# Altium PCB EEM_FMC_Carrier.PcbDoc (part 12 of 19)
Units mm, origin at the board's own origin, x right, y up, seen from the top; angles counter-clockwise.
Board outline 222.9 x 100 mm, 6 copper layers (TopLayer, MidLayer1, MidLayer2, SignalLayer1, Internal Plane 1, BottomLayer), stack 1.528 mm thick; 790 components, 743 nets, 3570 pads, 2277 vias.
Unrouted connection lines stored in the file: 3.
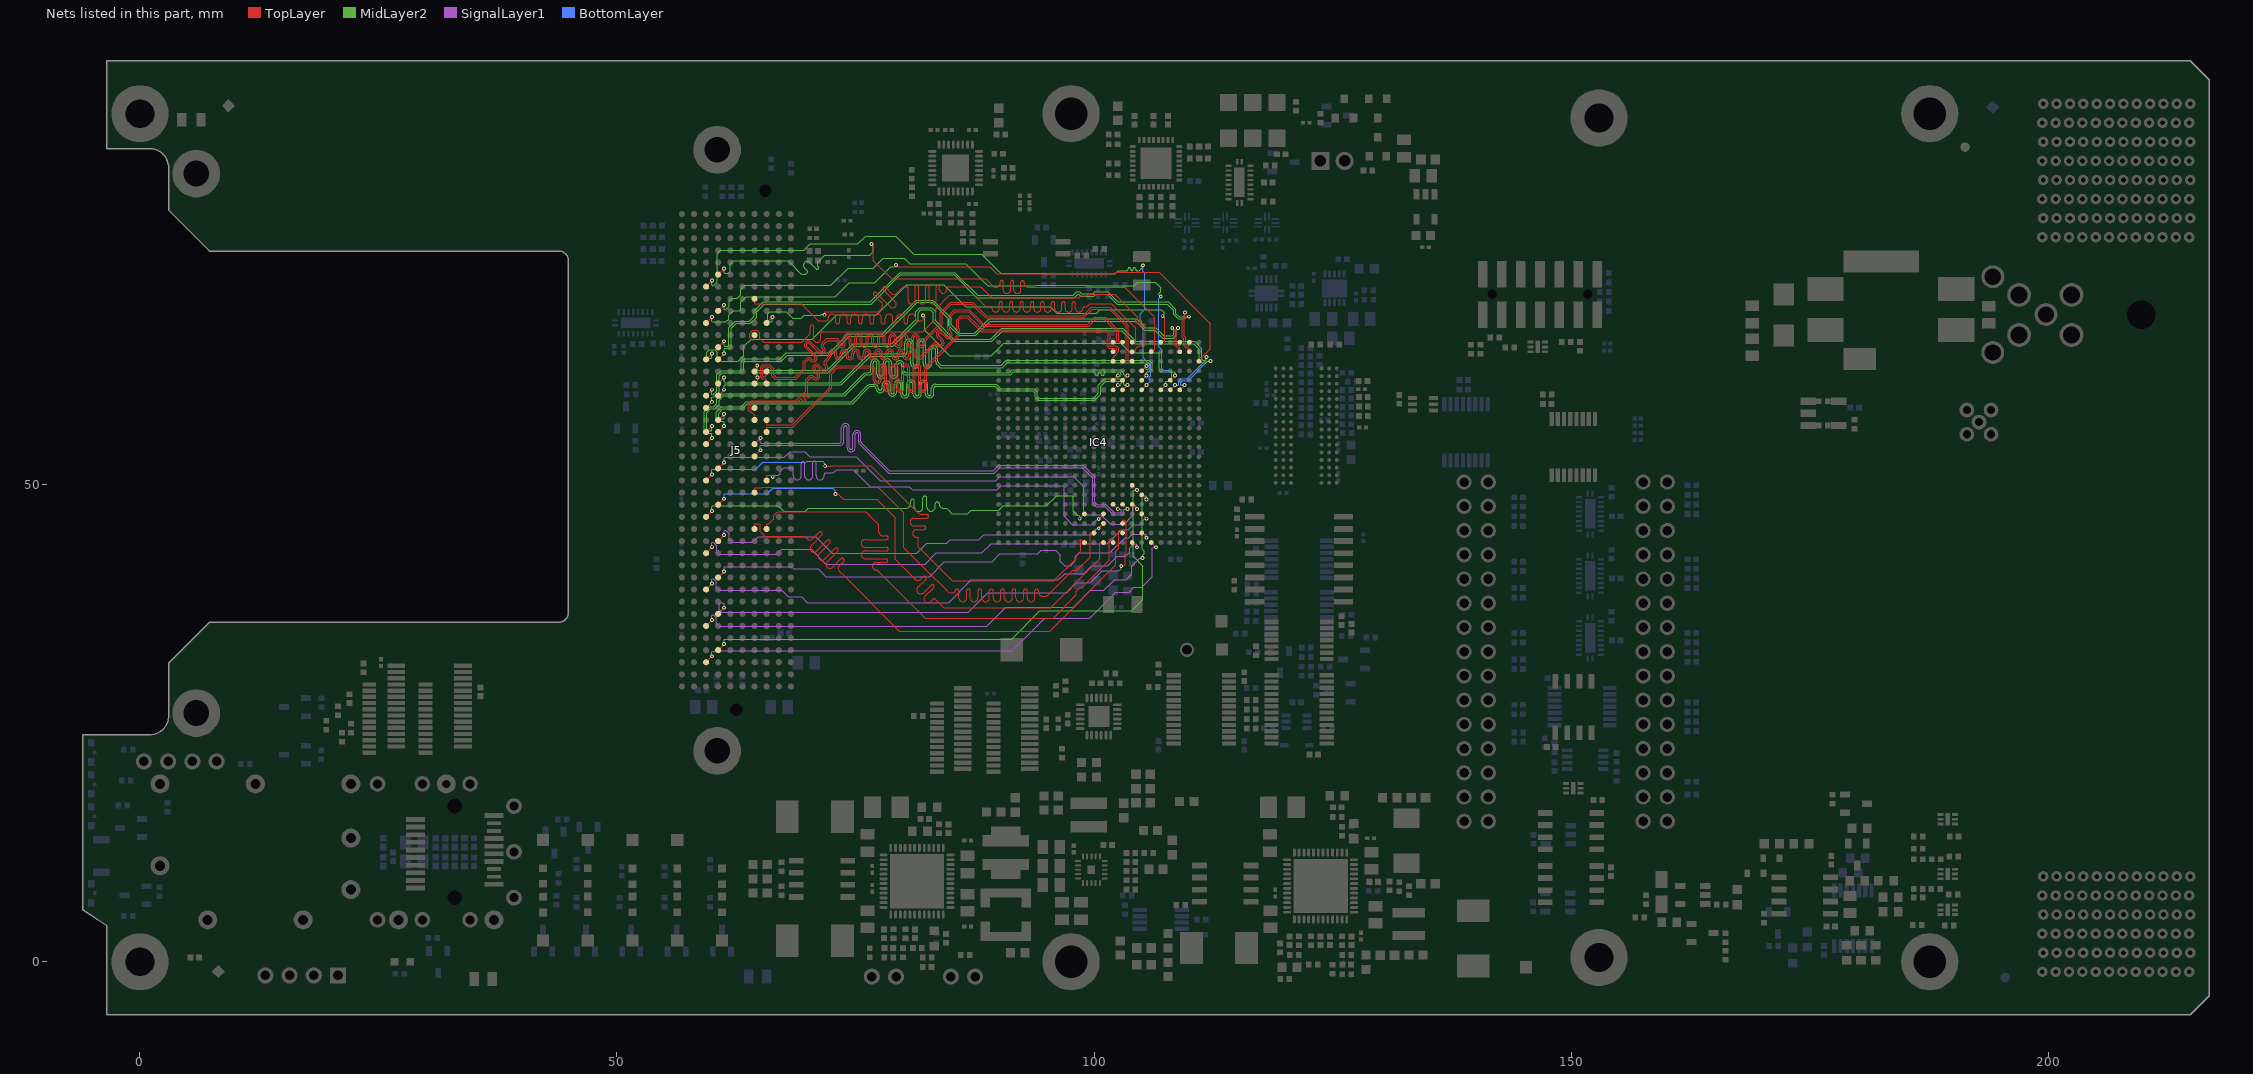
[diagram p14: the nets of this part, all layers, seen from the top]

## Via types
v1: diameter 0.4, hole 0.2, TopLayer to BottomLayer, tented both sides, 1032 vias
v2: diameter 0.5, hole 0.2, TopLayer to BottomLayer, tented both sides, 979 vias
v3: diameter 0.5, hole 0.2, TopLayer to BottomLayer, 162 vias
v4: diameter 0.8, hole 0.5, TopLayer to BottomLayer, tented both sides, 102 vias
v5: diameter 0.6, hole 0.3, TopLayer to BottomLayer, tented both sides, 2 vias

## Nets (pads, with @x,y where several pads share a name; then routed paths per layer and width w, separated by ;. In a path a pad name is that pad's centre, name@x,y a point inside that pad or via, vN(x,y) a via of type N, cw(c..) or ccw(c..) an arc to the next point about the centre after c; other vN are vias at no path point) (continued)
FMC.LA_N8: IC4.A21 J5.g13 | length 61.6
  TopLayer w0.085: J5.g13@60.608,63.149 61.218,63.759 v1(61.218,63.78) ; v1(109.948,67.625) 109.65,67.625 109.437,67.412 109.437,65.568 109.599,65.406 109.599,64.648 109.692,64.556 109.95,64.556 110,64.606 110,64.948 IC4.A21@109.998,64.95
  MidLayer2 w0.11: v1(61.218,63.78) 61.218,64.232 61.282,64.297 61.761,64.297 61.964,64.5 61.964,66.389 62.5,66.925 63.973,66.925 64.637,67.589 64.637,68.15 65.412,68.925 76.635,68.925 79.71,72 85.325,72 87.712,69.613 97.913,69.613 98.275,69.975 98.397,69.975 98.59,69.782 99.999,69.782 100.192,69.975 101.365,69.975 102.415,68.925 107.663,68.925 108.35,68.238 108.35,67.852 108.814,67.388 109.454,67.388 109.672,67.605 109.928,67.605 v1(109.948,67.625)
FMC.LA_N9: IC4.F20 J5.d15 | length 61.9
  TopLayer w0.085: J5.d15@64.418,60.609 64.748,60.939 64.748,61.239 v1(64.737,61.25) ; IC4.F20@108.998,59.95 v1(109.498,60.45)
  MidLayer2 w0.11: v1(64.737,61.25) 64.723,61.264 64.723,61.692 64.787,61.757 72.117,61.757 74.885,64.525 78.91,64.525 81.562,67.177 81.562,68.05 81.837,68.325 82.85,68.325 83.15,68.025 83.15,67.075 85.187,65.038 89.298,65.038 90.41,66.15 102.9,66.15 104.262,64.788 110.437,64.788 111.038,64.187 111.038,63.072 111.306,62.804 111.778,62.804 111.938,62.964 112.195,62.964 v1(112.214,62.984)
  BottomLayer w0.085: v1(109.498,60.45) 109.154,60.45 109.104,60.5 109.104,60.775 109.229,60.9 109.854,60.9 110.198,61.244 111.887,62.933 112.164,62.933 v1(112.214,62.984)
FMC.LA_N10: IC4.C15 J5.c15 | length 70.1
  TopLayer w0.085: J5.c15@65.688,60.609 65.656,60.641 65.656,61.006 65.525,61.138 65.23,61.138 65.056,61.312 65.056,61.35 65.056,62.356 65.287,62.587 66.013,62.587 66.45,62.15 66.45,61.731 66.45,61.525 66.675,61.3 68.65,61.3 69.538,62.188 69.538,62.682 69.538,62.888 69.831,63.181 cw(c70.117,62.895) 70.369,63.212 70.372,63.212 70.403,63.182 ; 69.733,64.397 70.708,63.421 cw(c70.573,63.284) 70.709,63.148 cw(c70.573,63.284) 70.437,63.148 70.403,63.181 ; 69.733,64.397 cw(c70.018,64.683) 69.732,64.969 69.733,64.971 cw(c70.018,64.683) 70.269,65 70.273,65 71.281,63.992 ccw(c71.417,64.129) 71.553,63.992 ccw(c71.417,64.129) 71.553,64.265 71.52,64.298 cw(c71.806,64.584) 71.52,64.87 71.625,64.975 71.78,65.13 71.987,65.337 72.935,65.337 cw(c72.935,64.933) 73.339,64.933 73.339,64.822 ccw(c73.532,64.822) 73.532,64.63 ccw(c73.532,64.822) 73.724,64.822 73.724,65.411 cw(c74.129,65.411) 74.129,65.816 cw(c74.129,65.411) 74.533,65.411 74.533,64.822 ccw(c74.726,64.822) 74.726,64.63 ccw(c74.726,64.822) 74.918,64.822 74.918,65.411 cw(c75.323,65.411) 75.323,65.816 cw(c75.323,65.411) 75.727,65.411 75.727,64.822 ccw(c75.92,64.822) 75.92,64.63 ccw(c75.92,64.822) 76.112,64.822 76.112,65.411 cw(c76.517,65.411) 76.517,65.816 cw(c76.517,65.411) 76.921,65.411 76.921,64.822 ccw(c77.114,64.822) 77.114,64.63 ccw(c77.114,64.822) 77.306,64.822 77.306,65.411 cw(c77.711,65.411) 77.711,65.816 cw(c77.711,65.411) 78.115,65.411 78.115,64.822 ccw(c78.308,64.822) 78.308,64.63 ccw(c78.308,64.822) 78.5,64.822 78.5,65.411 cw(c78.905,65.411) 78.905,65.816 cw(c78.905,65.411) 79.309,65.411 79.309,64.822 ccw(c79.502,64.822) 79.502,64.63 ccw(c79.502,64.822) 79.694,64.822 79.694,65.411 cw(c80.099,65.411) 80.099,65.816 cw(c80.099,65.411) 80.503,65.411 80.503,64.822 ccw(c80.696,64.822) 80.696,64.63 ccw(c80.696,64.822) 80.888,64.822 80.888,65.411 cw(c81.293,65.411) 81.293,65.816 cw(c81.293,65.411) 81.697,65.411 81.697,64.822 ccw(c81.89,64.822) 81.89,64.63 ccw(c81.89,64.822) 82.082,64.822 82.082,64.877 cw(c82.698,64.877) 82.261,65.311 cw(c82.699,64.878) 82.263,65.313 ; 82.264,65.314 82.486,65.536 83.875,66.925 83.875,68.05 84.962,69.137 87.288,69.137 88.725,67.7 98.8,67.7 99.737,68.637 101.688,68.637 103.604,66.721 103.604,63 103.654,62.95 IC4.C15@103.998,62.95
FMC.LA_N11: IC4.A20 J5.h17 | length 62.3
  TopLayer w0.085: J5.h17@59.338,58.069 59.948,58.679 v1(59.948,58.7) ; v1(108.798,66.45) 108.798,66.445 108.604,66.251 108.604,64.81 108.858,64.556 108.948,64.556 108.998,64.606 IC4.A20@108.998,64.95
  MidLayer2 w0.11: v1(59.948,58.7) 59.948,59.152 60.012,59.217 60.202,59.217 60.712,59.727 60.712,61.412 61.025,61.725 62.95,61.725 63.262,62.037 63.262,62.775 63.437,62.95 67.21,62.95 67.86,63.6 72.385,63.6 74.36,65.575 77.923,65.575 81.461,69.113 83.025,69.113 84.775,67.363 84.775,66.69 85.802,65.663 87.623,65.663 89.11,67.15 104.365,67.15 105.065,66.45 105.29,66.225 106.365,66.225 107.227,65.363 108.323,65.363 108.617,65.656 108.617,66.241 108.798,66.422 v1(108.798,66.45)
FMC.LA_N12: IC4.D16 J5.g16 | length 61.8
  TopLayer w0.085: J5.g16@60.608,59.339 61.218,59.949 v1(61.218,59.97) ; IC4.D16@104.998,61.95 v1(105.498,62.45)
  MidLayer2 w0.11: v1(61.218,59.97) 61.218,60.422 61.282,60.487 73.522,60.487 76.535,63.5 78.489,63.5 79.957,63.5 ccw(c79.957,63.942) 80.399,63.942 80.399,64.841 cw(c80.604,64.841) 80.604,65.046 cw(c80.604,64.841) 80.809,64.841 80.809,62.665 ccw(c81.251,62.665) 81.251,62.223 ccw(c81.251,62.665) 81.693,62.665 81.693,64.841 cw(c81.898,64.841) 81.898,65.046 cw(c81.898,64.841) 82.103,64.841 82.103,62.665 ccw(c82.545,62.665) 82.545,62.223 ccw(c82.545,62.665) 82.987,62.665 82.987,64.136 cw(c83.192,64.136) 83.192,64.341 cw(c83.192,64.136) 83.397,64.136 83.397,62.936 ccw(c83.839,62.936) 83.526,62.624 83.862,62.288 84.475,62.288 90.373,62.288 90.885,62.8 105.664,62.8 105.863,62.601 105.863,62.278 105.654,62.069 105.562,62.069 105.498,62.133 v1(105.498,62.45)
FMC.LA_N13: IC4.A14 J5.d18 | length 64.7
  TopLayer w0.085: J5.d18@64.418,56.799 64.418,57.278 64.035,57.661 63.933,57.661 63.759,57.835 63.759,58.422 64.137,58.8 68.738,58.8 69.763,59.825 69.763,60.852 69.763,61.013 70.086,61.336 cw(c70.372,61.05) 70.623,61.367 70.627,61.367 70.657,61.337 ; 70.611,61.927 cw(c70.897,62.214) 70.61,62.5 70.612,62.501 cw(c70.897,62.214) 71.148,62.531 71.151,62.531 71.562,62.12 ccw(c71.698,62.257) 71.834,62.121 ccw(c71.698,62.257) 71.834,62.393 71.775,62.452 cw(c72.061,62.738) 71.775,63.024 71.88,63.129 72.025,63.275 72.099,63.349 ; 70.611,61.927 70.989,61.549 cw(c70.854,61.412) 70.99,61.276 cw(c70.854,61.412) 70.718,61.276 70.658,61.336 ; 72.1,63.349 ccw(c71.813,63.634) 72.217,63.634 72.217,63.805 cw(c72.621,63.805) 72.621,64.21 cw(c72.621,63.805) 73.026,63.805 73.026,63.523 ccw(c73.218,63.523) 73.218,63.33 ccw(c73.218,63.523) 73.411,63.523 73.411,63.805 cw(c73.815,63.805) 73.815,64.21 cw(c73.815,63.805) 74.22,63.805 74.22,63.523 ccw(c74.412,63.523) 74.412,63.33 ccw(c74.412,63.523) 74.605,63.523 74.605,63.805 cw(c75.009,63.805) 75.009,64.21 cw(c75.009,63.805) 75.414,63.805 75.414,63.523 ccw(c75.606,63.523) 75.606,63.33 ccw(c75.606,63.523) 75.799,63.523 75.799,63.805 cw(c76.203,63.805) 76.203,64.21 cw(c76.203,63.805) 76.608,63.805 76.608,63.523 ccw(c76.8,63.523) 76.8,63.33 ccw(c76.8,63.523) 76.993,63.523 76.993,63.805 cw(c77.397,63.805) 77.397,64.21 cw(c77.397,63.805) 77.802,63.805 77.802,63.523 ccw(c77.994,63.523) 77.994,63.33 ccw(c77.994,63.523) 78.187,63.523 78.187,63.805 cw(c78.591,63.805) 78.591,64.21 cw(c78.591,63.805) 78.996,63.805 78.996,63.523 ccw(c79.188,63.523) 79.188,63.33 ccw(c79.188,63.523) 79.381,63.523 79.381,63.805 cw(c79.785,63.805) 79.785,64.21 cw(c79.785,63.805) 80.19,63.805 80.19,63.523 ccw(c80.382,63.523) 80.382,63.33 ccw(c80.382,63.523) 80.575,63.523 80.575,63.805 cw(c80.979,63.805) 80.979,64.21 cw(c80.979,63.805) 81.384,63.805 81.384,63.579 ccw(c81.576,63.579) 81.576,63.387 81.737,63.387 82.151,63.801 82.159,63.809 83.137,64.787 cw(c83.423,64.501) 83.674,64.818 83.678,64.818 83.708,64.788 ; 83.574,65.466 cw(c83.859,65.753) 83.573,66.039 83.575,66.04 cw(c83.859,65.753) 84.111,66.07 84.114,66.07 84.588,65.597 ccw(c84.724,65.733) 84.86,65.597 ccw(c84.724,65.733) 84.86,65.869 84.843,65.886 cw(c85.279,66.321) 84.663,66.322 84.663,66.637 84.663,67.638 85.362,68.337 86.938,68.337 88.463,66.812 99.337,66.812 100.087,67.562 101.167,67.562 102.129,66.6 102.604,66.125 102.604,65 102.654,64.95 IC4.A14@102.998,64.95 ; 83.574,65.466 84.015,65.025 cw(c83.88,64.888) 84.016,64.752 cw(c83.88,64.888) 83.744,64.752 83.709,64.787
FMC.LA_N14: IC4.B13 J5.c19 | length 69.4
  TopLayer w0.085: J5.c19@65.688,55.529 65.688,56.008 65.738,56.058 68.441,56.058 72.487,60.104 72.487,61.637 73.1,62.25 76.179,62.25 76.681,62.25 cw(c76.681,62.058) 76.873,62.058 76.873,60.99 ccw(c77.278,60.99) 77.278,60.585 ccw(c77.278,60.99) 77.682,60.99 77.682,62.249 cw(c77.875,62.249) 77.875,62.441 cw(c77.875,62.249) 78.067,62.249 78.067,60.115 ccw(c78.472,60.115) 78.472,59.71 ccw(c78.472,60.115) 78.876,60.115 78.876,62.249 cw(c79.069,62.249) 79.069,62.441 cw(c79.069,62.249) 79.261,62.249 79.261,60.115 ccw(c79.666,60.115) 79.666,59.71 ccw(c79.666,60.115) 80.07,60.115 80.07,62.249 cw(c80.263,62.249) 80.263,62.441 cw(c80.263,62.249) 80.455,62.249 80.455,60.115 ccw(c80.86,60.115) 80.86,59.71 ccw(c80.86,60.115) 81.264,60.115 81.264,62.249 cw(c81.457,62.249) 81.457,62.441 cw(c81.457,62.249) 81.649,62.249 81.649,60.115 ccw(c82.054,60.115) 82.054,59.71 ccw(c82.054,60.115) 82.458,60.115 82.458,62.016 cw(c82.862,62.016) 82.575,62.3 ; 82.576,62.301 82.65,62.375 85.937,65.662 85.937,66.286 85.823,66.4 85.823,67.223 86.1,67.5 86.725,67.5 87,67.225 88.187,66.038 101.262,66.038 101.515,65.785 101.515,65.348 101.396,65.229 101.396,64.512 101.57,64.338 102.262,64.338 102.397,64.203 102.397,64.132 102.294,64.029 102.077,64.029 IC4.B13@101.998,63.95
FMC.LA_N15: IC4.E14 J5.h20 | length 59.7
  TopLayer w0.085: J5.h20@59.338,54.259 59.948,54.869 v1(59.948,54.89) ; IC4.E14@102.998,60.95 v1(103.498,61.45)
  MidLayer2 w0.11: v1(59.948,54.89) 59.948,55.342 59.884,55.407 59.528,55.407 59.163,55.772 59.163,57.661 59.702,58.2 60.14,58.2 60.463,58.523 60.463,58.986 61.027,59.55 73.765,59.55 75.984,61.769 76.225,61.769 76.399,61.769 ccw(c76.399,61.974) 76.604,61.974 76.604,62.758 cw(c77.046,62.758) 77.046,63.2 cw(c77.046,62.758) 77.488,62.758 77.488,61.598 ccw(c77.693,61.598) 77.693,61.393 ccw(c77.693,61.598) 77.898,61.598 77.898,62.758 cw(c78.34,62.758) 78.34,63.2 cw(c78.34,62.758) 78.781,62.758 78.781,61.631 ccw(c78.986,61.631) 78.986,61.426 ccw(c78.986,61.631) 79.191,61.631 79.191,62.565 cw(c79.633,62.565) 79.633,63.007 cw(c79.633,62.565) 80.075,62.565 80.075,61.974 ccw(c80.28,61.974) 80.28,61.769 81.3,61.769 91.159,61.769 91.452,62.062 102.758,62.062 103.117,61.704 103.117,61.514 103.181,61.45 v1(103.498,61.45)
FMC.LA_N16: IC4.F14 J5.g19 | length 61.7
  TopLayer w0.085: J5.g19@60.608,55.529 61.218,56.139 v1(61.218,56.16) ; IC4.F14@102.998,59.95 v1(103.498,60.45)
  MidLayer2 w0.11: v1(61.218,56.16) 61.218,56.612 61.154,56.677 60.8,56.677 60.616,56.677 60.413,56.88 60.413,57.598 61.002,58.187 63.027,58.187 63.565,58.725 74.59,58.725 76.358,60.493 76.418,60.554 76.933,60.554 cw(c76.933,60.112) 77.375,60.112 ccw(c77.58,60.112) 77.58,59.907 ccw(c77.58,60.112) 77.785,60.112 77.785,60.435 cw(c78.227,60.435) 78.227,60.877 cw(c78.227,60.435) 78.669,60.435 78.669,59.732 ccw(c78.874,59.732) 78.874,59.527 ccw(c78.874,59.732) 79.079,59.732 79.079,60.539 cw(c79.521,60.539) 79.521,60.981 cw(c79.521,60.539) 79.963,60.539 79.963,59.546 ccw(c80.168,59.546) 80.168,59.341 ccw(c80.168,59.546) 80.373,59.546 80.373,60.539 cw(c80.815,60.539) 80.815,60.981 cw(c80.815,60.539) 81.257,60.539 81.257,59.546 ccw(c81.462,59.546) 81.462,59.341 ccw(c81.462,59.546) 81.667,59.546 81.667,60.539 cw(c82.109,60.539) 82.109,60.981 cw(c82.109,60.539) 82.551,60.539 82.551,59.546 ccw(c82.756,59.546) 82.756,59.341 ccw(c82.756,59.546) 82.961,59.546 82.961,60.112 cw(c83.403,60.112) 83.403,60.554 83.577,60.554 89.746,60.554 90.213,60.087 93.664,60.087 94.066,59.685 94.066,59.284 94.263,59.087 99.977,59.087 100.463,59.573 100.463,60.423 101.152,61.112 102.913,61.112 103.117,60.909 103.117,60.514 103.181,60.45 v1(103.498,60.45)
FMC.LA_N17: IC4.V14 J5.d21 | length 53.1
  TopLayer w0.085: J5.d21@64.418,52.989 65.028,53.599 v1(65.028,53.62) ; IC4.V14@102.998,47.95 v1(103.498,47.45)
  SignalLayer1 w0.11: v1(65.028,53.62) 65.028,54.072 65.092,54.137 73.175,54.137 73.349,54.137 ccw(c73.349,54.554) 73.766,54.554 73.766,55.997 cw(c73.946,55.997) 74.126,55.997 74.126,53.88 ccw(c74.543,53.88) 74.96,53.88 74.96,55.274 cw(c75.14,55.274) 75.32,55.274 75.32,54.543 ccw(c75.736,54.543) 75.442,54.248 76.242,53.448 78.459,51.231 89.556,51.231 90.125,51.8 98.775,51.8 99.863,50.712 99.863,48.052 100.24,47.675 101.19,47.675 102.015,46.85 102.88,46.85 102.913,46.85 103.117,47.053 103.117,47.386 103.181,47.45 v1(103.498,47.45)
FMC.LA_N18: IC4.W12 J5.c23 | length 49.7
  TopLayer w0.085: J5.c23@65.688,50.449 65.688,50.928 65.738,50.978 65.997,50.978 66.011,50.992 66.122,50.992 66.315,50.8 v1(66.323,50.8) ; v1(100.498,46.401) 100.998,46.901 IC4.W12@100.998,46.95
  SignalLayer1 w0.11: v1(66.323,50.8) 66.353,50.8 66.532,50.98 66.922,50.98 67.125,51.183 67.125,51.4 67.399,51.674 67.525,51.8 68.304,51.8 cw(c68.304,51.62) 68.484,51.62 68.484,50.934 ccw(c68.901,50.934) 69.318,50.934 69.318,52.222 cw(c69.498,52.222) 69.678,52.222 69.678,50.934 ccw(c70.095,50.934) 70.512,50.934 70.512,52.298 cw(c70.692,52.298) 70.872,52.298 70.872,50.934 ccw(c71.289,50.934) 71.706,50.934 71.706,51.058 cw(c71.886,51.058) 71.886,51.238 72.06,51.238 72.663,51.238 73.013,51.588 74.752,51.588 76.54,49.8 80.64,49.8 80.934,49.506 89.881,49.506 90.257,49.882 96.718,49.882 96.863,49.737 96.863,46.702 97.74,45.825 99.764,45.825 99.967,46.028 99.967,46.073 100.068,46.174 100.14,46.174 100.312,46.346 100.443,46.346 v1(100.498,46.401)
FMC.LA_N19: IC4.AB10 J5.h23 | length 56.4
  TopLayer w0.085: J5.h23@59.338,50.449 59.948,51.059 v1(59.948,51.08) ; v1(71.823,51.956) 71.824,51.957 72.33,51.957 72.395,52.022 76.603,52.022 76.875,51.75 81.329,47.296 81.551,47.074 ccw(c81.987,47.509) 81.555,47.07 ccw(c81.987,47.508) 81.987,46.893 82.464,46.893 cw(c82.464,46.7) 82.656,46.7 cw(c82.464,46.7) 82.464,46.508 81.144,46.508 ccw(c81.144,46.103) 80.74,46.103 ccw(c81.144,46.103) 81.144,45.699 82.183,45.699 cw(c82.183,45.506) 82.376,45.506 cw(c82.183,45.506) 82.183,45.314 81.407,45.314 ccw(c81.407,44.909) 81.003,44.909 ccw(c81.407,44.909) 81.407,44.505 ; 81.408,44.505 cw(c81.408,44.312) 81.6,44.312 81.6,43.475 81.675,43.4 85.025,40.05 85.137,39.938 95.788,39.938 98.125,42.275 98.125,42.575 98.591,43.041 98.591,44.187 98.641,44.236 98.712,44.236 IC4.AB10@98.998,43.95
  BottomLayer w0.085: v1(59.948,51.08) 59.948,51.559 59.998,51.609 60.825,51.609 60.829,51.613 64.563,51.613 65.3,52.35 69.8,52.35 69.925,52.475 71.543,52.475 71.796,52.222 71.796,51.983 v1(71.823,51.956)
FMC.LA_N20: IC4.V15 J5.g22 | length 52.3
  TopLayer w0.085: J5.g22@60.608,51.719 61.218,52.329 v1(61.218,52.35) ; IC4.V15@103.998,47.95 v1(104.498,47.45)
  SignalLayer1 w0.11: v1(61.218,52.35) 61.218,52.802 61.282,52.867 61.893,52.867 61.896,52.863 67.538,52.863 68.15,53.475 69.675,53.475 70.225,52.925 75.1,52.925 77.575,50.45 88.498,50.45 89.725,50.45 90.1,50.825 97.9,50.825 98.913,49.812 98.913,47.127 99.158,46.882 100.733,46.882 101.733,45.882 103.157,45.882 104.066,46.791 104.066,47.767 104.13,47.831 104.275,47.831 104.443,47.664 104.443,47.505 v1(104.498,47.45)
FMC.LA_N21: IC4.W10 J5.h26 | length 49.4
  TopLayer w0.085: J5.h26@59.338,46.639 59.948,47.249 v1(59.948,47.27) ; v1(98.498,46.45) IC4.W10@98.998,46.95
  MidLayer2 w0.11: v1(59.948,47.27) 59.948,47.722 60.012,47.787 66.928,47.787 67.477,47.238 69.723,47.238 70.041,47.556 80.154,47.556 80.327,47.556 ccw(c80.327,47.998) 80.769,47.998 80.769,48.28 cw(c80.974,48.28) 80.974,48.485 cw(c80.974,48.28) 81.179,48.28 81.179,47.647 ccw(c81.621,47.647) 81.621,47.205 ccw(c81.621,47.647) 82.063,47.647 82.063,48.603 cw(c82.268,48.603) 82.268,48.808 cw(c82.268,48.603) 82.473,48.603 82.473,47.674 ccw(c82.915,47.674) 82.915,47.232 ccw(c82.915,47.674) 83.357,47.674 83.357,47.998 cw(c83.562,47.998) 83.562,48.203 cw(c83.562,47.998) 83.767,47.998 ccw(c84.209,47.998) 84.209,47.556 84.534,47.556 84.774,47.316 85.109,46.981 86.781,46.981 87.125,47.325 90,47.325 90.463,47.788 95.013,47.788 96.1,48.875 97.65,48.875 97.835,48.69 97.835,47.232 98.236,46.831 98.425,46.831 98.498,46.758 v1(98.498,46.45)
FMC.LA_N22: IC4.AB12 J5.g25 | length 59.1
  TopLayer w0.085: J5.g25@60.608,47.909 61.218,48.519 v1(61.218,48.54) ; v1(72.89,49.032) 72.898,49.024 73.168,49.024 73.717,48.475 77.25,48.475 79.163,46.562 79.163,42.187 81.15,40.2 81.212,40.138 81.224,40.126 81.255,40.095 ccw(c81.541,40.381) 81.827,40.095 82.071,40.339 cw(c82.207,40.203) 82.343,40.339 cw(c82.207,40.203) 82.343,40.067 ; 82.343,40.066 81.537,39.26 ccw(c81.823,38.974) 82.074,38.657 82.078,38.657 82.915,39.495 cw(c83.051,39.359) 83.188,39.495 cw(c83.051,39.359) 83.188,39.222 82.274,38.309 ccw(c82.56,38.023) 82.811,37.706 82.815,37.706 83.094,37.984 cw(c83.23,37.848) 83.366,37.984 84.237,37.113 84.888,37.113 95.488,37.113 100.604,42.229 100.604,43.9 100.654,43.95 IC4.AB12@100.998,43.95
  BottomLayer w0.085: v1(61.218,48.54) 61.218,49.019 61.268,49.069 65.769,49.069 66.35,49.65 72.614,49.65 72.89,49.373 v1@72.89,49.032
FMC.LA_N23: IC4.AA11 J5.d24 | length 62.6
  TopLayer w0.085: J5.d24@64.418,49.179 64.418,49.658 64.468,49.708 65.17,49.708 65.212,49.75 77.4,49.75 80.063,47.087 80.063,43.412 82.275,41.2 84.604,38.871 84.677,38.798 ccw(c84.753,38.872) 84.69,38.787 ccw(c85.05,39.286) 85.413,38.789 ccw(c85.35,38.874) 85.456,38.874 cw(c85.648,38.874) 85.648,39.067 cw(c85.648,38.874) 85.841,38.874 85.841,38.152 ccw(c86.245,38.152) 86.245,37.748 ccw(c86.245,38.152) 86.65,38.152 86.65,38.874 cw(c86.842,38.874) 86.842,39.067 cw(c86.842,38.874) 87.035,38.874 87.035,38.152 ccw(c87.439,38.152) 87.439,37.748 ccw(c87.439,38.152) 87.844,38.152 87.844,38.874 cw(c88.036,38.874) 88.036,39.067 cw(c88.036,38.874) 88.229,38.874 88.229,38.152 ccw(c88.633,38.152) 88.633,37.748 ccw(c88.633,38.152) 89.038,38.152 89.038,38.874 cw(c89.23,38.874) 89.23,39.067 cw(c89.23,38.874) 89.423,38.874 89.423,38.152 ccw(c89.827,38.152) 89.827,37.748 ccw(c89.827,38.152) 90.232,38.152 90.232,38.874 cw(c90.424,38.874) 90.424,39.067 cw(c90.424,38.874) 90.617,38.874 90.617,38.152 ccw(c91.021,38.152) 91.021,37.748 ccw(c91.021,38.152) 91.426,38.152 91.426,38.874 cw(c91.618,38.874) 91.618,39.067 cw(c91.618,38.874) 91.811,38.874 91.811,38.152 ccw(c92.215,38.152) 92.215,37.748 ccw(c92.215,38.152) 92.62,38.152 92.62,38.874 cw(c92.812,38.874) 92.812,39.067 cw(c92.812,38.874) 93.005,38.874 93.005,38.152 ccw(c93.409,38.152) 93.409,37.748 ccw(c93.409,38.152) 93.814,38.152 93.814,38.874 cw(c94.006,38.874) 94.006,39.067 cw(c94.006,38.874) 94.199,38.874 94.199,38.717 ccw(c94.603,38.717) 94.603,38.313 95.063,38.313 95.162,38.412 97.773,41.023 98.197,41.023 99.604,42.429 99.604,44.9 99.654,44.95 IC4.AA11@99.998,44.95
FMC.LA_N24: IC4.W16 J5.h29 | length 51.4
  TopLayer w0.085: J5.h29@59.338,42.829 59.948,43.439 v1(59.948,43.46) ; IC4.W16@104.998,46.95 v1(105.498,46.45)
  SignalLayer1 w0.11: v1(59.948,43.46) 59.948,43.912 60.012,43.977 60.104,43.977 60.463,43.617 60.463,42.977 60.727,42.713 66.763,42.713 67.275,43.225 70.365,43.225 71.902,41.688 82.288,41.688 83.475,42.875 88.251,42.875 89.215,43.839 101.389,43.839 102.838,45.288 103.573,45.288 104.096,45.811 104.8,45.811 105.117,46.127 105.117,46.225 105.286,46.394 105.443,46.394 v1(105.498,46.45)
FMC.LA_N25: IC4.Y12 J5.g28 | length 44.4
  TopLayer w0.085: J5.g28@60.608,44.099 61.218,44.709 v1(61.218,44.73) ; v1(100.498,45.45) IC4.Y12@100.998,45.95
  SignalLayer1 w0.11: v1(61.218,44.73) 61.218,45.182 61.282,45.247 61.374,45.247 61.758,44.862 61.758,44.267 62.05,43.975 64.185,43.975 64.785,44.575 70.815,44.575 72.552,42.838 81.423,42.838 82.473,43.888 84.573,43.888 84.935,44.25 87.9,44.25 88.431,44.781 99.913,44.781 100.117,44.984 100.117,45.25 100.261,45.395 100.443,45.395 v1(100.498,45.45)
FMC.LA_N26: IC4.AA14 J5.d27 | length 64.1
  TopLayer w0.085: J5.d27@64.418,45.369 64.418,45.848 64.468,45.898 64.937,45.898 65.014,45.821 65.014,45.062 65.462,44.613 69.637,44.613 69.825,44.425 69.93,44.32 ccw(c70.216,44.606) 70.502,44.32 71.197,45.015 cw(c71.333,44.879) 71.469,45.015 cw(c71.333,44.879) 71.469,44.742 ; 71.468,44.742 70.349,43.623 ccw(c70.635,43.337) 70.349,43.051 ccw(c70.635,43.337) 70.887,43.02 70.89,43.02 72.041,44.17 cw(c72.177,44.034) 72.313,44.17 cw(c72.177,44.034) 72.313,43.898 ; 72.313,43.897 71.194,42.779 ccw(c71.48,42.493) 71.731,42.175 71.735,42.175 72.885,43.326 cw(c73.021,43.19) 73.158,43.326 cw(c73.021,43.19) 73.158,43.054 72.038,41.934 ccw(c72.324,41.648) 72.038,41.362 ccw(c72.324,41.648) 72.575,41.331 72.579,41.331 73.474,42.226 cw(c73.61,42.09) 73.746,42.226 cw(c73.61,42.09) 73.746,41.954 73.307,41.515 ccw(c73.593,41.229) 73.307,40.943 73.75,40.5 79.587,34.663 95.363,34.663 102.3,41.6 102.3,43.05 102.591,43.341 102.591,45.187 102.641,45.236 102.712,45.236 IC4.AA14@102.998,44.95
FMC.LA_N27: IC4.AB13 J5.c27 | length 63.1
  TopLayer w0.085: J5.c27@65.688,45.369 65.688,45.848 65.738,45.898 65.896,45.898 66.07,46.072 ; 66.07,46.073 66.45,46.453 66.45,46.775 66.875,47.2 76.1,47.2 77.463,45.837 77.463,45.2 77.463,45.051 ccw(c77.867,45.051) 77.867,44.647 78.245,44.647 cw(c78.245,44.454) 78.438,44.454 cw(c78.245,44.454) 78.245,44.262 76.005,44.262 ccw(c76.005,43.857) 75.6,43.857 ccw(c76.005,43.857) 76.005,43.453 78.245,43.453 cw(c78.245,43.26) 78.438,43.26 cw(c78.245,43.26) 78.245,43.068 76.005,43.068 ccw(c76.005,42.663) 75.6,42.663 ccw(c76.005,42.663) 76.005,42.259 78.189,42.259 cw(c78.189,42.066) 78.382,42.066 cw(c78.189,42.066) 78.189,41.874 77.18,41.874 ccw(c77.18,41.469) 76.776,41.469 ccw(c77.18,41.469) 77.18,41.065 cw(c77.18,40.872) 77.317,41.008 78.275,40.05 80.325,38 82.287,36.038 95.738,36.038 98.15,38.45 98.15,38.846 98.542,39.238 98.763,39.238 101.591,42.066 101.591,44.294 101.641,44.344 101.948,44.344 101.998,44.294 IC4.AB13@101.998,43.95
FMC.LA_N28: IC4.AB15 J5.h32 | length 51.1
  TopLayer w0.085: J5.h32@59.338,39.019 59.948,39.629 v1(59.948,39.65) ; IC4.AB15@103.998,43.95 v1(104.498,43.45)
  SignalLayer1 w0.11: v1(59.948,39.65) 59.948,40.102 60.012,40.167 60.104,40.167 60.413,39.857 60.413,39.252 60.727,38.938 67.264,38.938 67.927,38.275 69.34,38.275 69.965,37.65 84.76,37.65 87.135,40.025 96.275,40.025 96.938,40.688 98.913,40.688 99.763,41.538 101.463,41.538 102.438,42.513 103.311,42.513 103.75,42.952 103.75,43.375 104.206,43.831 104.35,43.831 104.467,43.715 104.467,43.481 v1(104.498,43.45)
FMC.LA_N29: IC4.AA16 J5.g31 | length 50.9
  TopLayer w0.085: J5.g31@60.608,40.289 61.218,40.899 v1(61.218,40.92) ; IC4.AA16@104.998,44.95 v1(105.498,44.45)
  SignalLayer1 w0.11: v1(61.218,40.92) 61.218,41.372 61.282,41.437 68.253,41.437 68.515,41.175 71.115,41.175 71.902,40.388 82.763,40.388 84.313,41.938 89.313,41.938 90.132,42.757 94.082,42.757 94.45,43.125 95.99,43.125 96.478,42.637 96.478,41.987 96.927,41.538 97.538,41.538 98.037,42.037 98.037,42.437 98.463,42.863 101.638,42.863 103.25,44.475 103.644,44.475 104,44.831 105.4,44.831 105.492,44.74 105.492,44.456 v1(105.498,44.45)
FMC.LA_N30: IC4.U16 J5.h35 | length 58.9
  TopLayer w0.085: J5.h35@59.338,35.209 59.948,35.819 v1(59.948,35.84) ; IC4.U16@104.998,48.95 v1(105.498,48.45)
  MidLayer2 w0.11: v1(105.072,42.326) 105.092,42.345 105.092,42.602 105.25,42.76 105.25,43.048 105.066,43.232 105.066,45.685 105.066,48.767 105.13,48.831 105.434,48.831 105.498,48.767 v1(105.498,48.45)
  SignalLayer1 w0.11: v1(59.948,35.84) 59.948,36.292 60.012,36.357 60.104,36.357 60.413,36.047 60.413,35.463 60.713,35.163 88.738,35.163 90.763,37.188 97.863,37.188 99.625,38.95 101.037,38.95 102.15,40.063 103.398,40.063 103.95,40.615 103.95,41.46 104.796,42.306 105.053,42.306 v1(105.072,42.326)
FMC.LA_N31: IC4.Y14 J5.g34 | length 52.7
  TopLayer w0.085: J5.g34@60.608,36.479 61.218,37.089 v1(61.218,37.11) ; v1(102.856,41.505) 102.884,41.532 103.122,41.532 103.255,41.665 103.255,42.732 103.404,42.881 103.404,46.079 103.139,46.344 103.048,46.344 102.998,46.294 IC4.Y14@102.998,45.95
  SignalLayer1 w0.11: v1(61.218,37.11) 61.218,37.482 61.075,37.625 60.789,37.625 60.725,37.561 60.725,36.925 61,36.65 86.815,36.65 88.865,38.7 97.14,38.7 98.165,39.725 99.618,39.725 100.86,40.967 102.587,40.967 102.842,41.223 102.842,41.491 v1(102.856,41.505)
FMC.LA_N32: IC4.AB17 J5.h38 | length 54.9
  TopLayer w0.085: J5.h38@59.338,31.399 59.948,32.009 v1(59.948,32.03) ; IC4.AB17@105.998,43.95 v1(106.498,43.45)
  SignalLayer1 w0.11: v1(59.948,32.03) 59.948,32.482 60.012,32.547 60.281,32.547 60.359,32.625 91.45,32.625 94.863,36.038 99.563,36.038 102.288,38.763 103.688,38.763 104.181,39.256 105.006,39.256 106.125,40.375 106.125,42.031 106.125,42.45 106.125,43.386 106.189,43.45 v1(106.498,43.45)
FMC.LA_N33: IC4.T15 J5.g37 | length 59.9
  TopLayer w0.085: J5.g37@60.608,32.669 61.218,33.279 v1(61.218,33.3) ; IC4.T15@103.998,49.95 v1(104.498,49.45)
  MidLayer2 w0.11: v1(61.218,33.3) 61.218,33.752 61.282,33.817 91.367,33.817 94.338,36.788 103.948,36.788 105.125,37.965 105.125,41.475 104.15,42.45 104.117,42.483 104.117,49.386 104.181,49.45 v1(104.498,49.45)
FMC.LA_P0: IC4.B17 J5.g6 | length 65.7
  TopLayer w0.085: J5.g6@60.608,72.039 61.218,72.649 v1(61.218,72.67) ; v1(76.673,75.25) 76.673,75.245 76.867,75.051 76.867,73.506 78.798,71.575 88.673,71.575 89.523,70.725 89.625,70.725 89.774,70.725 ccw(c89.774,71.105) 90.153,71.105 90.153,71.249 cw(c90.321,71.249) 90.488,71.249 90.488,70.439 ccw(c90.868,70.439) 91.247,70.439 91.247,71.249 cw(c91.415,71.249) 91.582,71.249 91.582,70.439 ccw(c91.962,70.439) 92.341,70.439 92.341,71.223 cw(c92.509,71.223) 92.676,71.223 92.676,71.105 ccw(c93.056,71.105) 93.056,70.725 93.733,70.725 103.2,70.725 106.125,67.8 106.392,67.533 106.392,64.188 106.233,64.029 106.077,64.029 IC4.B17@105.998,63.95
  MidLayer2 w0.11: v1(61.218,72.67) 61.218,72.218 61.282,72.154 61.693,72.154 61.86,72.32 61.86,73.12 62.202,73.462 67.938,73.462 69.325,72.075 69.765,72.075 69.807,72.118 69.93,72.24 ccw(c69.821,72.35) 69.93,72.459 69.652,72.738 cw(c69.929,73.015) 69.652,73.292 69.653,73.293 cw(c69.929,73.015) 70.206,73.292 70.871,72.627 ccw(c70.981,72.737) 71.09,72.627 ccw(c70.981,72.737) 71.09,72.847 ; 71.09,72.847 cw(c71.368,73.123) 71.09,73.401 71.765,74.075 71.825,74.075 76.5,74.075 76.855,74.43 76.855,75.041 76.673,75.222 v1(76.673,75.25)
FMC.LA_P1: IC4.E19 J5.d8 | length 64
  TopLayer w0.085: J5.d8@64.418,69.499 64.418,69.02 64.468,68.97 65.15,68.97 69.305,68.97 71.097,67.178 71.097,67.175 71.792,67.175 71.94,67.175 ccw(c71.94,67.367) 72.133,67.367 72.133,67.484 cw(c72.537,67.484) 72.537,67.889 cw(c72.537,67.484) 72.942,67.484 72.942,67.06 ccw(c73.134,67.06) 73.134,66.868 ccw(c73.134,67.06) 73.327,67.06 73.327,67.484 cw(c73.731,67.484) 73.731,67.889 cw(c73.731,67.484) 74.136,67.484 74.136,67.06 ccw(c74.328,67.06) 74.328,66.868 ccw(c74.328,67.06) 74.521,67.06 74.521,67.484 cw(c74.925,67.484) 74.925,67.889 cw(c74.925,67.484) 75.33,67.484 75.33,67.06 ccw(c75.522,67.06) 75.522,66.868 ccw(c75.522,67.06) 75.715,67.06 75.715,67.484 cw(c76.119,67.484) 76.119,67.889 cw(c76.119,67.484) 76.524,67.484 76.524,67.06 ccw(c76.716,67.06) 76.716,66.868 ccw(c76.716,67.06) 76.909,67.06 76.909,67.484 cw(c77.313,67.484) 77.313,67.889 cw(c77.313,67.484) 77.718,67.484 77.718,67.06 ccw(c77.91,67.06) 77.91,66.868 ccw(c77.91,67.06) 78.103,67.06 78.103,67.484 cw(c78.507,67.484) 78.507,67.889 cw(c78.507,67.484) 78.912,67.484 78.912,67.06 ccw(c79.104,67.06) 79.104,66.868 ccw(c79.104,67.06) 79.297,67.06 79.297,67.484 cw(c79.701,67.484) 79.701,67.889 cw(c79.701,67.484) 80.106,67.484 80.106,67.06 ccw(c80.298,67.06) 80.298,66.868 ccw(c80.298,67.06) 80.491,67.06 80.491,67.484 cw(c80.895,67.484) 80.895,67.889 cw(c80.895,67.484) 81.3,67.484 81.3,67.372 ccw(c81.492,67.372) 81.492,67.179 81.961,67.179 81.966,67.184 82.267,67.485 82.267,67.555 82.073,67.749 v1(82.073,67.754) ; IC4.E19@107.998,60.95 v1(108.498,61.45)
  MidLayer2 w0.11: v1(82.073,67.754) 82.073,67.726 82.255,67.545 82.255,66.185 84.902,63.538 89.248,63.538 90.535,64.825 102.8,64.825 103.775,63.85 106.786,63.85 106.85,63.786 106.85,62.053 107.053,61.85 108.434,61.85 108.498,61.786 v1(108.498,61.45)
FMC.LA_P2: IC4.F16 J5.h7 | length 67.8
  TopLayer w0.085: J5.h7@59.338,70.769 59.948,71.379 v1(59.948,71.4) ; IC4.F16@104.998,59.95 v1(105.498,60.45)
  MidLayer2 w0.11: v1(59.948,71.4) 59.948,70.948 60.012,70.884 60.123,70.884 60.513,71.273 60.513,74.234 60.846,74.568 69.557,74.568 70.232,75.242 75.257,75.242 76.077,76.062 79.213,76.062 81.088,74.187 88.223,74.187 90.216,72.194 94.956,72.194 95.05,72.1 102.19,72.1 102.538,72.448 103.244,72.449 103.299,72.449 103.445,72.449 ccw(c103.445,72.579) 103.575,72.579 103.575,72.646 cw(c103.705,72.646) 103.835,72.646 103.835,72.58 ccw(c103.965,72.58) 104.095,72.58 104.095,72.646 cw(c104.225,72.646) 104.355,72.646 104.355,72.58 ccw(c104.485,72.58) 104.485,72.45 104.55,72.45 104.765,72.45 104.8,72.485 105.08,72.765 105.08,72.961 v1(105.13,73.011)
  BottomLayer w0.085: v1(105.13,73.011) 105.137,73.004 105.137,72.733 105.107,72.703 105.107,72.405 105.313,72.199 105.313,68.388 104.838,67.913 104.838,67.087 104.9,67.025 105.138,66.787 105.138,66.45 105.138,63.312 105.579,62.872 105.704,62.872 105.925,62.65 105.925,61.417 105.776,61.268 105.776,61.022 105.888,60.91 105.888,60.84 v1(105.498,60.45)
FMC.LA_P3: IC4.F18 J5.g9 | length 64.2
  TopLayer w0.085: J5.g9@60.608,68.229 61.218,68.839 v1(61.218,68.86) ; IC4.F18@106.998,59.95 v1(107.498,60.45)
  MidLayer2 w0.11: v1(61.218,68.86) 61.218,68.408 61.282,68.344 61.374,68.344 61.763,68.733 61.763,69.261 62.077,69.575 62.625,69.575 62.963,69.913 62.963,70.486 63.377,70.9 72.425,70.9 74.225,72.7 76.865,72.7 77.902,73.737 80.088,73.737 80.663,73.162 86.538,73.162 88.85,70.85 93.867,70.85 93.935,70.918 99.119,70.918 99.187,70.85 104.215,70.85 104.577,71.212 106.423,71.212 106.975,70.66 106.975,70.214 106.811,70.05 106.811,69.934 106.992,69.753 v1(106.992,69.725)
  BottomLayer w0.085: v1(106.992,69.725) 106.992,69.72 106.798,69.526 106.798,66.45 106.798,64.452 107.112,64.138 107.112,62.163 107.25,62.025 107.875,62.025 108.137,61.763 108.137,61.102 107.878,60.843 107.547,60.843 107.497,60.793 v1@107.497,60.451
FMC.LA_P4: IC4.C22 J5.h10 | length 63.9
  TopLayer w0.085: J5.h10@59.338,66.959 59.948,67.569 v1(59.948,67.59) ; v1(79.253,73.049) 79.263,73.049 79.454,72.858 79.757,72.858 79.759,72.856 89.094,72.856 89.35,72.6 89.5,72.45 89.813,72.137 102.218,72.137 102.35,72.269 106.831,72.269 112.2,66.9 112.2,64.287 111.285,63.373 111.156,63.373 111.077,63.294 111.077,63.142 110.998,63.062 IC4.C22@110.998,62.95
  MidLayer2 w0.11: v1(59.948,67.59) 59.948,67.138 60.012,67.074 61.388,67.074 61.688,67.373 61.688,67.748 62.177,68.237 62.838,68.237 62.988,68.387 62.988,69.148 63.54,69.7 72.865,69.7 74.352,71.187 77.021,71.187 78.702,72.868 79.044,72.868 79.225,73.049 v1(79.253,73.049)
FMC.LA_P5: IC4.A15 J5.d11 | length 66.6
  TopLayer w0.085: J5.d11@64.418,65.689 64.412,65.682 64.412,65.291 64.335,65.214 64.136,65.214 63.902,65.448 63.902,65.827 64.25,66.175 64.698,66.175 64.963,65.91 64.963,65.362 65.377,64.948 69.085,64.948 69.348,64.948 70.155,65.755 ccw(c69.885,66.022) 70.265,66.022 70.265,66.581 cw(c70.432,66.581) 70.6,66.581 70.6,65.315 ccw(c70.979,65.315) 71.359,65.315 71.359,65.895 cw(c71.526,65.895) 71.526,66.063 71.675,66.063 82.062,66.063 83.386,67.386 83.386,68.412 84.848,69.875 87.423,69.875 88.17,69.128 88.636,68.663 89.139,68.663 cw(c89.139,68.495) 89.307,68.495 89.307,68.486 ccw(c89.686,68.486) 90.066,68.486 90.066,69.032 cw(c90.233,69.032) 90.401,69.032 90.401,68.486 ccw(c90.78,68.486) 91.16,68.486 91.16,69.032 cw(c91.327,69.032) 91.495,69.032 91.495,68.486 ccw(c91.874,68.486) 92.254,68.486 92.254,69.032 cw(c92.421,69.032) 92.589,69.032 92.589,68.486 ccw(c92.968,68.486) 93.348,68.486 93.348,69.032 cw(c93.515,69.032) 93.683,69.032 93.683,68.486 ccw(c94.062,68.486) 94.442,68.486 94.442,69.032 cw(c94.609,69.032) 94.777,69.032 94.777,68.486 ccw(c95.156,68.486) 95.536,68.486 95.536,69.032 cw(c95.703,69.032) 95.871,69.032 95.871,68.486 ccw(c96.25,68.486) 96.63,68.486 96.63,69.032 cw(c96.797,69.032) 96.965,69.032 96.965,68.486 ccw(c97.344,68.486) 97.724,68.486 97.724,69.032 cw(c97.891,69.032) 98.059,69.032 98.059,68.486 ccw(c98.438,68.486) 98.818,68.486 98.818,68.495 cw(c98.985,68.495) 98.985,68.663 99.225,68.663 99.531,68.969 99.685,68.969 101.823,68.969 104.392,66.4 104.392,65 104.342,64.95 IC4.A15@103.998,64.95
FMC.LA_P6: IC4.B15 J5.c10 | length 69.9
  TopLayer w0.085: J5.c10@65.688,66.959 66.298,67.569 v1(66.298,67.59) ; v1(71.74,67.818) 71.776,67.854 71.776,68.076 71.847,68.147 77.369,68.147 77.649,68.426 77.755,68.532 ccw(c77.485,68.8) 77.754,69.068 76.916,69.906 cw(c77.034,70.025) 76.916,70.143 cw(c77.034,70.025) 77.153,70.143 ; 77.153,70.142 78.621,68.675 ccw(c78.89,68.943) 79.158,68.674 79.159,68.675 ccw(c78.89,68.943) 79.189,69.176 79.189,69.18 78.559,69.81 77.911,70.458 cw(c78.029,70.576) 77.911,70.695 cw(c78.029,70.576) 78.148,70.695 78.764,70.079 ccw(c79.033,70.347) 79.301,70.078 79.683,70.461 79.9,70.677 ; 79.9,70.677 79.973,70.75 80.35,70.75 cw(c80.35,70.583) 80.518,70.583 80.518,69.337 ccw(c80.897,69.337) 81.277,69.337 81.277,70.778 cw(c81.444,70.778) 81.612,70.778 81.612,69.337 ccw(c81.991,69.337) 82.371,69.337 82.371,70.778 cw(c82.538,70.778) 82.706,70.778 82.706,69.371 ccw(c83.085,69.371) 83.465,69.371 83.465,70.778 cw(c83.632,70.778) 83.8,70.778 83.8,70.465 ccw(c84.179,70.465) 84.559,70.465 84.559,70.583 cw(c84.726,70.583) 84.726,70.75 84.875,70.75 88.123,70.75 89.26,69.613 98.436,69.613 98.629,69.806 99.229,69.806 99.398,69.975 102.177,69.975 104.316,67.836 104.346,67.806 104.547,67.605 cw(c104.447,67.504) 104.547,67.403 104.386,67.242 ccw(c104.486,67.141) 104.386,67.04 ccw(c104.486,67.141) 104.587,67.04 104.749,67.202 cw(c104.85,67.101) 104.95,67.202 cw(c104.85,67.101) 104.95,67 104.806,66.856 ccw(c104.907,66.756) 104.806,66.655 ccw(c104.907,66.756) 105.008,66.655 105.152,66.799 cw(c105.253,66.698) 105.353,66.799 105.38,66.772 105.38,66.483 105.38,64.655 105.285,64.56 104.686,64.56 104.392,64.267 104.392,64.088 104.308,64.004 104.052,64.004 IC4.B15@103.998,63.95
  MidLayer2 w0.11: v1(66.298,67.59) 66.298,67.159 66.234,67.095 65.965,67.095 65.8,67.26 65.8,67.925 66.025,68.15 67.74,68.15 68.427,67.463 69.288,67.463 69.613,67.788 71.36,67.788 71.44,67.868 71.69,67.868 v1(71.74,67.818)
FMC.LA_P7: IC4.A18 J5.h13 | length 60.2
  TopLayer w0.085: J5.h13@59.338,63.149 59.948,63.759 v1(59.948,63.78) ; IC4.A18@106.998,64.95 107.07,65.022 107.289,65.022 107.392,65.125 107.392,67.089 107.392,67.476 107.198,67.67 v1(107.198,67.675)
  MidLayer2 w0.11: v1(59.948,63.78) 59.948,63.337 59.875,63.264 59.575,63.264 59.4,63.438 59.4,63.9 59.675,64.175 60.225,64.175 60.5,63.9 60.5,63.377 60.914,62.963 62.698,62.963 63.287,63.552 63.287,64.5 64.062,65.275 70.485,65.275 73.01,67.8 77.21,67.8 80.385,70.975 84.275,70.975 86.575,68.675 95.4,68.675 96.069,68.006 100.266,68.006 100.593,68.332 107.068,68.332 107.38,68.021 107.38,67.884 107.198,67.703 v1(107.198,67.675)
FMC.LA_P8: IC4.B21 J5.g12 | length 61.9
  TopLayer w0.085: J5.g12@60.608,64.419 61.218,65.029 v1(61.218,65.05) ; v1@109.524,68.044 109.502,68.023 109.502,67.777 109.225,67.5 109.225,65.481 109.387,65.318 109.387,64.561 109.604,64.344 109.925,64.344 109.975,64.294 109.975,63.973 IC4.B21@109.998,63.95
  MidLayer2 w0.11: v1(61.218,65.05) 61.218,64.598 61.282,64.534 61.662,64.534 61.727,64.598 61.727,66.487 62.402,67.162 63.875,67.162 64.4,67.687 64.4,68.248 65.314,69.162 76.537,69.162 79.612,72.237 85.423,72.237 87.81,69.85 97.815,69.85 98.177,70.212 98.495,70.212 98.688,70.019 99.901,70.019 100.094,70.212 101.463,70.212 102.513,69.162 107.761,69.162 108.587,68.336 108.587,67.95 108.912,67.625 109.356,67.625 109.504,67.773 109.504,68.03 v1(109.524,68.049)
FMC.LA_P9: IC4.F19 J5.d14 | length 61.8
  TopLayer w0.085: J5.d14@64.418,61.879 64.418,61.882 64.698,62.162 v1(64.698,62.5) ; IC4.F19@107.998,59.95 v1(108.498,60.45)
  MidLayer2 w0.11: v1(64.698,62.5) 64.698,62.083 64.787,61.994 72.019,61.994 74.787,64.762 78.812,64.762 81.325,67.275 81.325,68.148 81.739,68.562 82.948,68.562 83.387,68.123 83.387,67.173 85.285,65.275 89.2,65.275 90.312,66.387 102.998,66.387 104.36,65.025 110.535,65.025 111.275,64.285 111.275,63.17 111.404,63.041 111.68,63.041 111.768,63.129 111.768,63.386 v1(111.788,63.406)
  BottomLayer w0.085: v1(108.498,60.45) 108.842,60.45 108.892,60.5 108.892,60.862 109.142,61.112 109.766,61.112 110.198,61.544 111.733,63.078 111.733,63.35 v1(111.788,63.406)
FMC.LA_P10: IC4.C14 J5.c14 | length 69.1
  TopLayer w0.085: J5.c14@65.688,61.879 65.656,61.847 65.656,61.481 65.525,61.35 65.318,61.35 65.268,61.4 65.268,61.438 65.268,62.268 65.375,62.375 65.925,62.375 66.238,62.062 66.238,61.819 66.238,61.437 66.587,61.088 68.738,61.088 69.75,62.1 69.75,62.47 69.75,62.8 69.981,63.032 cw(c70.117,62.895) 70.254,63.031 70.286,62.999 ; 70.286,62.999 ccw(c70.573,63.284) 70.859,62.998 70.86,62.999 ccw(c70.573,63.284) 70.89,63.535 70.89,63.539 69.882,64.547 cw(c70.018,64.683) 69.882,64.819 cw(c70.018,64.683) 70.155,64.819 71.13,63.843 ccw(c71.417,64.129) 71.703,63.843 71.704,63.844 ccw(c71.417,64.129) 71.734,64.38 71.734,64.384 71.67,64.448 cw(c71.806,64.584) 71.67,64.72 71.775,64.825 71.78,64.831 72.075,65.125 72.935,65.125 cw(c72.935,64.933) 73.127,64.933 73.127,64.822 ccw(c73.532,64.822) 73.532,64.418 ccw(c73.532,64.822) 73.936,64.822 73.936,65.411 cw(c74.129,65.411) 74.129,65.604 cw(c74.129,65.411) 74.321,65.411 74.321,64.822 ccw(c74.726,64.822) 74.726,64.418 ccw(c74.726,64.822) 75.13,64.822 75.13,65.411 cw(c75.323,65.411) 75.323,65.604 cw(c75.323,65.411) 75.515,65.411 75.515,64.822 ccw(c75.92,64.822) 75.92,64.418 ccw(c75.92,64.822) 76.324,64.822 76.324,65.411 cw(c76.517,65.411) 76.517,65.604 cw(c76.517,65.411) 76.709,65.411 76.709,64.822 ccw(c77.114,64.822) 77.114,64.418 ccw(c77.114,64.822) 77.518,64.822 77.518,65.411 cw(c77.711,65.411) 77.711,65.604 cw(c77.711,65.411) 77.903,65.411 77.903,64.822 ccw(c78.308,64.822) 78.308,64.418 ccw(c78.308,64.822) 78.712,64.822 78.712,65.411 cw(c78.905,65.411) 78.905,65.604 cw(c78.905,65.411) 79.097,65.411 79.097,64.822 ccw(c79.502,64.822) 79.502,64.418 ccw(c79.502,64.822) 79.906,64.822 79.906,65.411 cw(c80.099,65.411) 80.099,65.604 cw(c80.099,65.411) 80.291,65.411 80.291,64.822 ccw(c80.696,64.822) 80.696,64.418 ccw(c80.696,64.822) 81.1,64.822 81.1,65.411 cw(c81.293,65.411) 81.293,65.604 cw(c81.293,65.411) 81.485,65.411 81.485,64.822 ccw(c81.89,64.822) 81.89,64.418 ccw(c81.89,64.822) 82.294,64.822 82.294,64.877 cw(c82.698,64.877) 82.412,65.162 ; 82.412,65.163 82.486,65.236 84.087,66.837 84.087,67.962 85.05,68.925 87.2,68.925 87.875,68.25 88.637,67.488 98.888,67.488 99.825,68.425 101.6,68.425 102.05,67.975 103.392,66.633 103.392,63 103.342,62.95 IC4.C14@102.998,62.95
FMC.LA_P11: IC4.B20 J5.h16 | length 62.3
  TopLayer w0.085: J5.h16@59.338,59.339 59.948,59.949 v1(59.948,59.97) ; v1(108.198,66.45) 108.198,66.445 108.392,66.251 108.392,64.722 108.77,64.344 108.948,64.344 108.998,64.294 IC4.B20@108.998,63.95
  MidLayer2 w0.11: v1(59.948,59.97) 59.948,59.518 60.012,59.454 60.104,59.454 60.475,59.825 60.475,61.51 60.927,61.962 62.852,61.962 63.025,62.135 63.025,62.873 63.339,63.187 67.112,63.187 67.762,63.837 72.287,63.837 74.262,65.812 77.825,65.812 81.363,69.35 83.123,69.35 85.012,67.461 85.012,66.788 85.9,65.9 87.525,65.9 89.012,67.387 104.463,67.387 105.388,66.462 106.463,66.462 106.475,66.45 107.325,65.6 108.225,65.6 108.38,65.755 108.38,66.241 108.198,66.422 v1(108.198,66.45)
FMC.LA_P12: IC4.E16 J5.g15 | length 62.6
  TopLayer w0.085: J5.g15@60.608,60.609 61.218,61.219 v1(61.218,61.24) ; IC4.E16@104.998,60.95 v1(105.498,61.45)
  MidLayer2 w0.11: v1(61.218,61.24) 61.218,60.788 61.282,60.724 73.424,60.724 76.437,63.737 78.489,63.737 79.957,63.737 ccw(c79.957,63.942) 80.162,63.942 80.162,64.841 cw(c80.604,64.841) 80.604,65.283 cw(c80.604,64.841) 81.046,64.841 81.046,62.665 ccw(c81.251,62.665) 81.251,62.46 ccw(c81.251,62.665) 81.456,62.665 81.456,64.841 cw(c81.898,64.841) 81.898,65.283 cw(c81.898,64.841) 82.34,64.841 82.34,62.665 ccw(c82.545,62.665) 82.545,62.46 ccw(c82.545,62.665) 82.75,62.665 82.75,64.136 cw(c83.192,64.136) 83.192,64.578 cw(c83.192,64.136) 83.634,64.136 83.634,62.936 ccw(c83.839,62.936) 83.694,62.791 83.96,62.525 84.475,62.525 90.275,62.525 90.787,63.037 105.762,63.037 106.1,62.699 106.1,62.18 105.752,61.832 105.562,61.832 105.498,61.767 v1(105.498,61.45)
FMC.LA_P13: IC4.A13 J5.d17 | length 64.6
  TopLayer w0.085: J5.d17@64.418,58.069 64.286,58.069 64.091,57.873 64.02,57.873 63.971,57.923 63.971,58.334 64.225,58.588 68.826,58.588 68.944,58.706 69.175,58.938 cw(c69.276,58.837) 69.377,58.938 69.54,58.775 ccw(c69.64,58.876) 69.741,58.775 ccw(c69.64,58.876) 69.741,58.977 69.579,59.139 cw(c69.679,59.24) 69.579,59.341 cw(c69.679,59.24) 69.78,59.341 69.933,59.188 ccw(c70.033,59.289) 70.134,59.188 ccw(c70.033,59.289) 70.134,59.39 70.017,59.507 cw(c70.118,59.608) 69.975,59.608 69.975,60.025 69.975,60.64 69.975,60.925 70.236,61.186 cw(c70.372,61.05) 70.509,61.185 70.567,61.127 ccw(c70.854,61.412) 71.14,61.126 71.141,61.128 ccw(c70.854,61.412) 71.171,61.664 71.171,61.667 70.76,62.078 cw(c70.897,62.214) 70.76,62.35 cw(c70.897,62.214) 71.033,62.35 ; 71.033,62.349 71.411,61.971 ; 71.411,61.971 ccw(c71.698,62.257) 71.984,61.971 71.985,61.972 ccw(c71.698,62.257) 72.015,62.508 72.015,62.512 71.924,62.602 cw(c72.061,62.738) 71.924,62.874 72.029,62.979 72.126,63.076 72.248,63.198 ; 72.248,63.198 ccw(c71.813,63.633) 72.25,63.2 ccw(c71.813,63.634) 72.429,63.634 72.429,63.805 cw(c72.621,63.805) 72.621,63.998 cw(c72.621,63.805) 72.814,63.805 72.814,63.523 ccw(c73.218,63.523) 73.218,63.118 ccw(c73.218,63.523) 73.623,63.523 73.623,63.805 cw(c73.815,63.805) 73.815,63.998 cw(c73.815,63.805) 74.008,63.805 74.008,63.523 ccw(c74.412,63.523) 74.412,63.118 ccw(c74.412,63.523) 74.817,63.523 74.817,63.805 cw(c75.009,63.805) 75.009,63.998 cw(c75.009,63.805) 75.202,63.805 75.202,63.523 ccw(c75.606,63.523) 75.606,63.118 ccw(c75.606,63.523) 76.011,63.523 76.011,63.805 cw(c76.203,63.805) 76.203,63.998 cw(c76.203,63.805) 76.396,63.805 76.396,63.523 ccw(c76.8,63.523) 76.8,63.118 ccw(c76.8,63.523) 77.205,63.523 77.205,63.805 cw(c77.397,63.805) 77.397,63.998 cw(c77.397,63.805) 77.59,63.805 77.59,63.523 ccw(c77.994,63.523) 77.994,63.118 ccw(c77.994,63.523) 78.399,63.523 78.399,63.805 cw(c78.591,63.805) 78.591,63.998 cw(c78.591,63.805) 78.784,63.805 78.784,63.523 ccw(c79.188,63.523) 79.188,63.118 ccw(c79.188,63.523) 79.593,63.523 79.593,63.805 cw(c79.785,63.805) 79.785,63.998 cw(c79.785,63.805) 79.978,63.805 79.978,63.523 ccw(c80.382,63.523) 80.382,63.118 ccw(c80.382,63.523) 80.787,63.523 80.787,63.805 cw(c80.979,63.805) 80.979,63.998 cw(c80.979,63.805) 81.172,63.805 81.172,63.579 ccw(c81.576,63.579) 81.576,63.175 81.825,63.175 82.151,63.501 82.309,63.659 83.287,64.637 cw(c83.423,64.501) 83.56,64.637 83.593,64.603 ; 83.593,64.603 ccw(c83.88,64.888) 84.166,64.602 84.167,64.604 ccw(c83.88,64.888) 84.197,65.14 84.197,65.143 83.723,65.617 cw(c83.859,65.753) 83.723,65.889 cw(c83.859,65.753) 83.996,65.889 84.437,65.447 ccw(c84.724,65.733) 85.01,65.447 85.011,65.448 ccw(c84.724,65.733) 85.041,65.984 85.041,65.988 84.993,66.035 cw(c85.279,66.321) 84.875,66.322 84.875,66.425 84.875,67.55 85.45,68.125 86.85,68.125 87.425,67.55 88.375,66.6 99.425,66.6 100.175,67.35 101.079,67.35 101.829,66.6 101.979,66.45 102.392,66.037 102.392,65 102.342,64.95 IC4.A13@101.998,64.95
FMC.LA_P14: IC4.C13 J5.c18 | length 70.7
  TopLayer w0.085: J5.c18@65.688,56.799 65.688,56.32 65.738,56.27 68.353,56.27 72.275,60.192 72.275,61.725 73.012,62.462 76.179,62.462 76.681,62.462 cw(c76.681,62.058) 77.085,62.058 77.085,60.99 ccw(c77.278,60.99) 77.278,60.797 ccw(c77.278,60.99) 77.47,60.99 77.47,62.249 cw(c77.875,62.249) 77.875,62.653 cw(c77.875,62.249) 78.279,62.249 78.279,60.115 ccw(c78.472,60.115) 78.472,59.922 ccw(c78.472,60.115) 78.664,60.115 78.664,62.249 cw(c79.069,62.249) 79.069,62.653 cw(c79.069,62.249) 79.473,62.249 79.473,60.115 ccw(c79.666,60.115) 79.666,59.922 ccw(c79.666,60.115) 79.858,60.115 79.858,62.249 cw(c80.263,62.249) 80.263,62.653 cw(c80.263,62.249) 80.667,62.249 80.667,60.115 ccw(c80.86,60.115) 80.86,59.922 ccw(c80.86,60.115) 81.052,60.115 81.052,62.249 cw(c81.457,62.249) 81.457,62.653 cw(c81.457,62.249) 81.861,62.249 81.861,60.115 ccw(c82.054,60.115) 82.054,59.922 ccw(c82.054,60.115) 82.246,60.115 82.246,62.016 cw(c82.862,62.016) 82.425,62.45 cw(c82.862,62.017) 82.427,62.452 82.65,62.675 85.725,65.75 85.725,66.198 85.611,66.312 85.611,67.311 86.012,67.712 86.813,67.712 87.15,67.375 87.3,67.225 88.275,66.25 101.35,66.25 101.665,65.935 101.727,65.873 101.727,65.26 101.608,65.142 101.608,64.6 101.658,64.55 102.35,64.55 102.547,64.353 102.609,64.291 102.609,64.045 102.379,63.815 102.379,63.752 101.998,63.371 IC4.C13@101.998,62.95
FMC.LA_P15: IC4.E13 J5.h19 | length 59.4
  TopLayer w0.085: J5.h19@59.338,55.529 59.948,56.139 v1(59.948,56.16) ; IC4.E13@101.998,60.95 v1(102.498,61.45)
  MidLayer2 w0.11: v1(59.948,56.16) 59.948,55.708 59.884,55.644 59.627,55.644 59.4,55.87 59.4,57.563 59.8,57.963 60.238,57.963 60.7,58.425 60.7,58.888 61.125,59.313 73.863,59.313 76.082,61.532 76.225,61.532 76.399,61.532 ccw(c76.399,61.974) 76.841,61.974 76.841,62.758 cw(c77.046,62.758) 77.046,62.963 cw(c77.046,62.758) 77.251,62.758 77.251,61.598 ccw(c77.693,61.598) 77.693,61.156 ccw(c77.693,61.598) 78.135,61.598 78.135,62.758 cw(c78.34,62.758) 78.34,62.963 cw(c78.34,62.758) 78.545,62.758 78.545,61.631 ccw(c78.986,61.631) 78.986,61.189 ccw(c78.986,61.631) 79.428,61.631 79.428,62.565 cw(c79.633,62.565) 79.633,62.77 cw(c79.633,62.565) 79.838,62.565 79.838,61.974 ccw(c80.28,61.974) 80.28,61.532 81.3,61.532 91.257,61.532 91.55,61.825 99.621,61.825 99.986,61.825 cw(c99.986,61.67) 100.141,61.67 100.141,61.61 ccw(c100.296,61.61) 100.296,61.455 ccw(c100.296,61.61) 100.451,61.61 100.451,61.67 cw(c100.606,61.67) 100.606,61.825 cw(c100.606,61.67) 100.761,61.67 100.761,61.614 ccw(c100.916,61.614) 100.916,61.459 ccw(c100.916,61.614) 101.071,61.614 101.071,61.67 cw(c101.226,61.67) 101.226,61.825 101.575,61.825 102.66,61.825 102.88,61.606 102.88,61.514 102.815,61.45 v1(102.498,61.45)
FMC.LA_P16: IC4.F13 J5.g18 | length 60.5
  TopLayer w0.085: J5.g18@60.608,56.799 61.218,57.409 v1(61.218,57.43) ; IC4.F13@101.998,59.95 v1(102.498,60.45)
  MidLayer2 w0.11: v1(61.218,57.43) 61.218,56.978 61.154,56.914 60.714,56.914 60.65,56.978 60.65,57.5 61.1,57.95 63.125,57.95 63.663,58.488 74.688,58.488 76.358,60.158 76.517,60.317 76.933,60.317 cw(c76.933,60.112) 77.138,60.112 ccw(c77.58,60.112) 77.58,59.67 ccw(c77.58,60.112) 78.022,60.112 78.022,60.435 cw(c78.227,60.435) 78.227,60.64 cw(c78.227,60.435) 78.432,60.435 78.432,59.732 ccw(c78.874,59.732) 78.874,59.29 ccw(c78.874,59.732) 79.316,59.732 79.316,60.539 cw(c79.521,60.539) 79.521,60.744 cw(c79.521,60.539) 79.726,60.539 79.726,59.546 ccw(c80.168,59.546) 80.168,59.104 ccw(c80.168,59.546) 80.61,59.546 80.61,60.539 cw(c80.815,60.539) 80.815,60.744 cw(c80.815,60.539) 81.02,60.539 81.02,59.546 ccw(c81.462,59.546) 81.462,59.104 ccw(c81.462,59.546) 81.904,59.546 81.904,60.539 cw(c82.109,60.539) 82.109,60.744 cw(c82.109,60.539) 82.314,60.539 82.314,59.546 ccw(c82.756,59.546) 82.756,59.104 ccw(c82.756,59.546) 83.198,59.546 83.198,60.112 cw(c83.403,60.112) 83.403,60.317 83.577,60.317 89.648,60.317 90.115,59.85 93.566,59.85 93.829,59.587 93.829,59.186 94.165,58.85 100.075,58.85 100.7,59.475 100.7,60.325 101.25,60.875 102.815,60.875 102.88,60.811 102.88,60.514 102.815,60.45 v1(102.498,60.45)
FMC.LA_P17: IC4.V13 J5.d20 | length 52.7
  TopLayer w0.085: J5.d20@64.418,54.259 65.028,54.869 v1(65.028,54.89) ; IC4.V13@101.998,47.95 v1(102.498,47.45)
  SignalLayer1 w0.11: v1(65.028,54.89) 65.028,54.438 65.092,54.374 73.175,54.374 73.349,54.374 ccw(c73.349,54.554) 73.529,54.554 73.529,55.997 cw(c73.946,55.997) 74.363,55.997 74.363,53.88 ccw(c74.543,53.88) 74.723,53.88 74.723,55.274 cw(c75.14,55.274) 75.556,55.274 75.556,54.543 ccw(c75.736,54.543) 75.609,54.416 76.242,53.783 78.557,51.468 89.457,51.468 90.027,52.037 98.873,52.037 100.1,50.81 100.1,48.15 100.338,47.912 101.288,47.912 102.113,47.087 102.781,47.087 102.815,47.087 102.88,47.151 102.88,47.386 102.815,47.45 v1(102.498,47.45)